# Allegro board T736_DEMO_CORE_AXP8191_LP4_4X_32X1_V2_0.brd
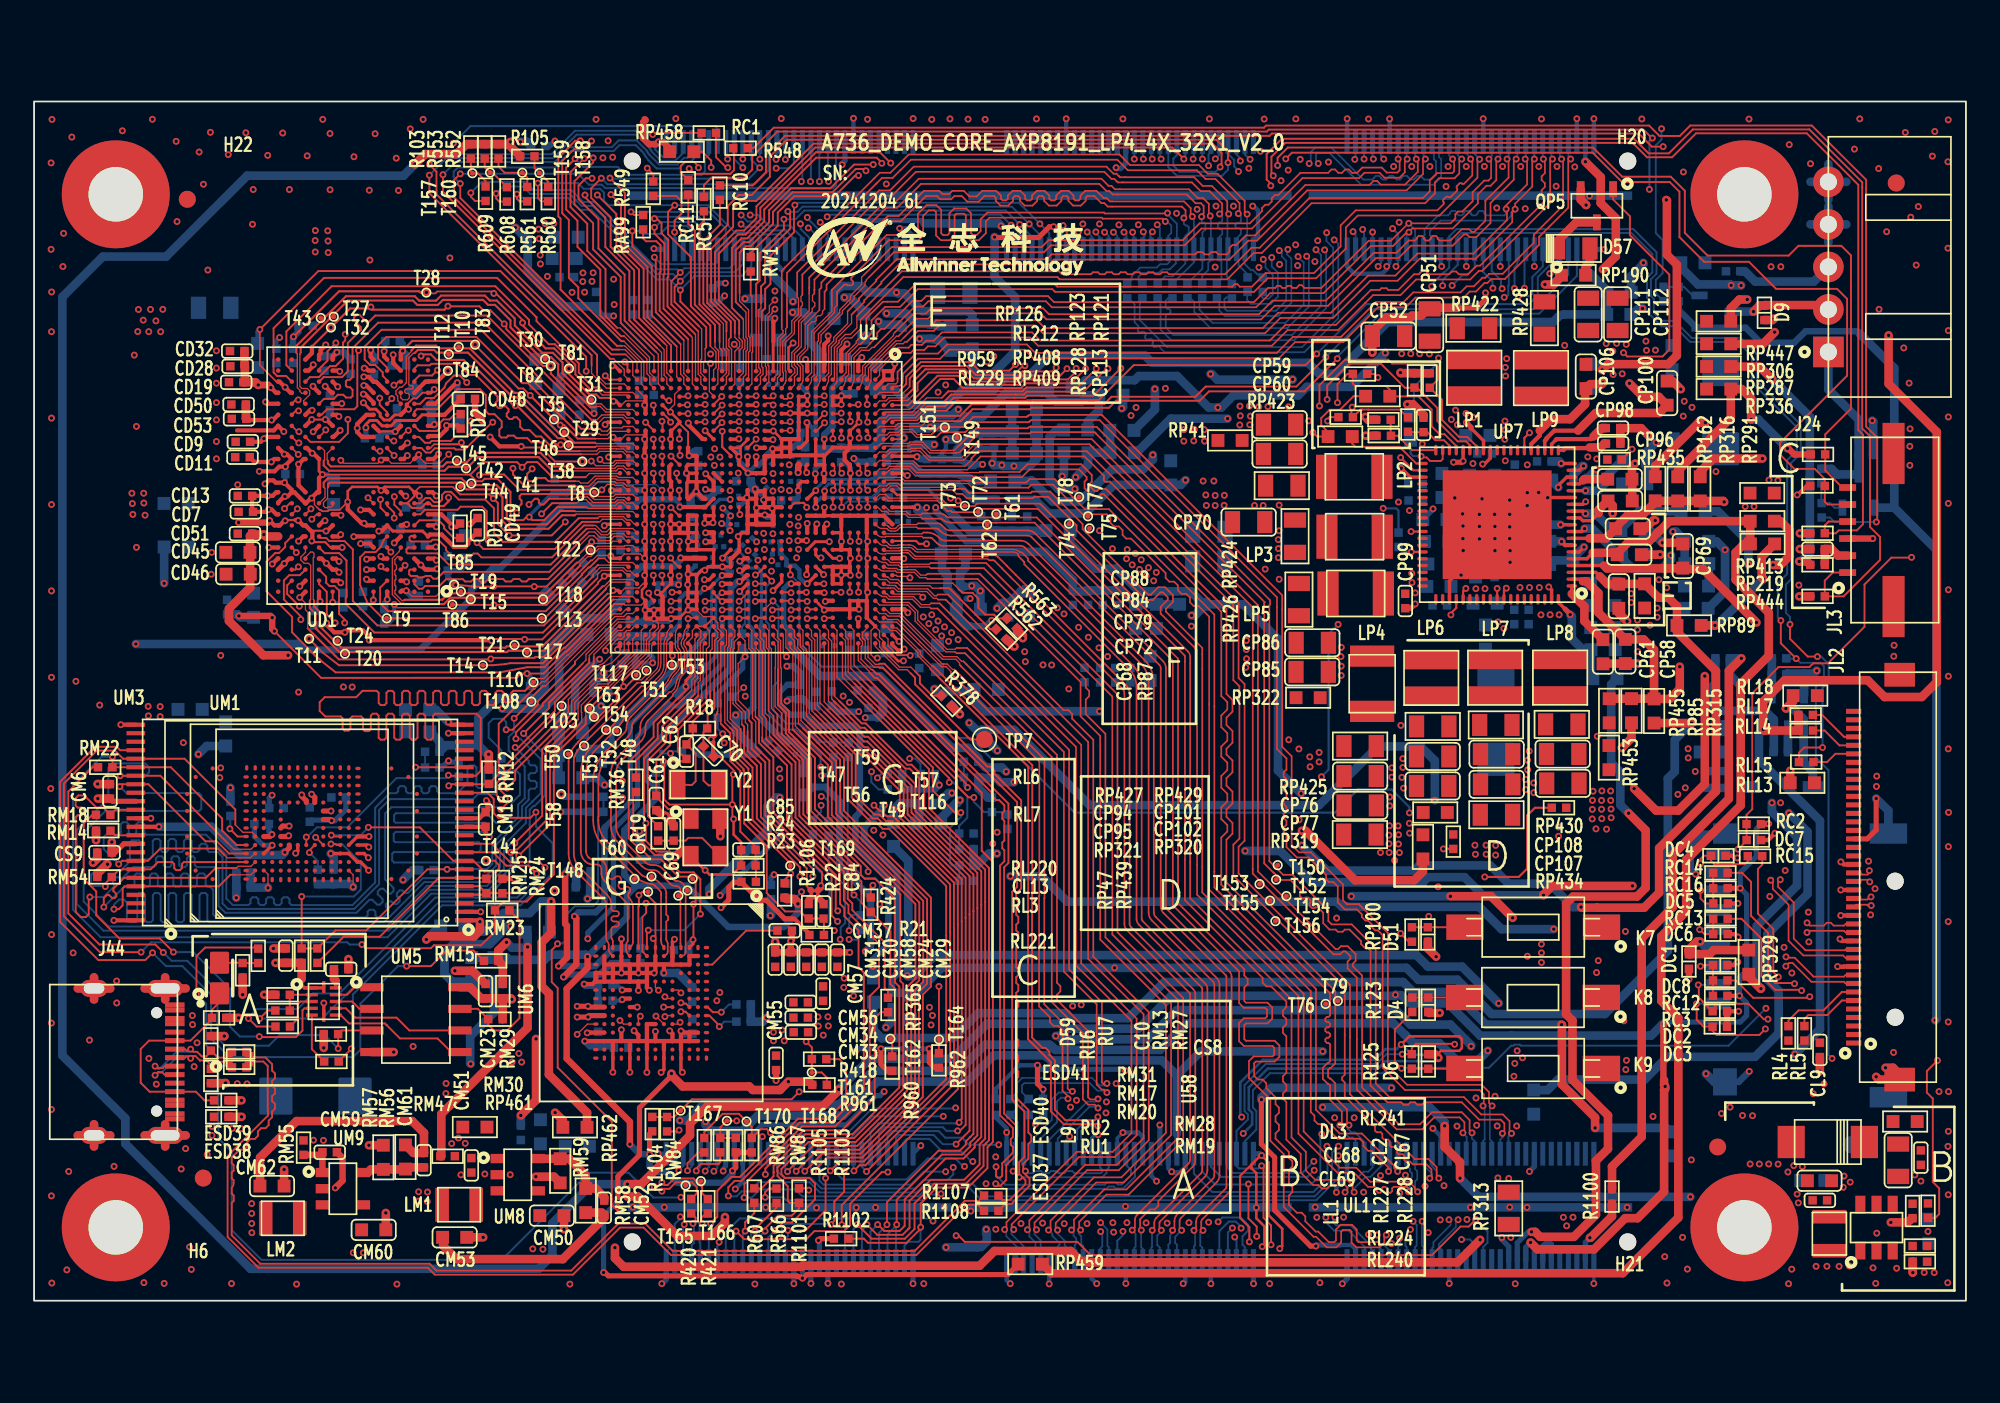
[diagram p0: board, top side]
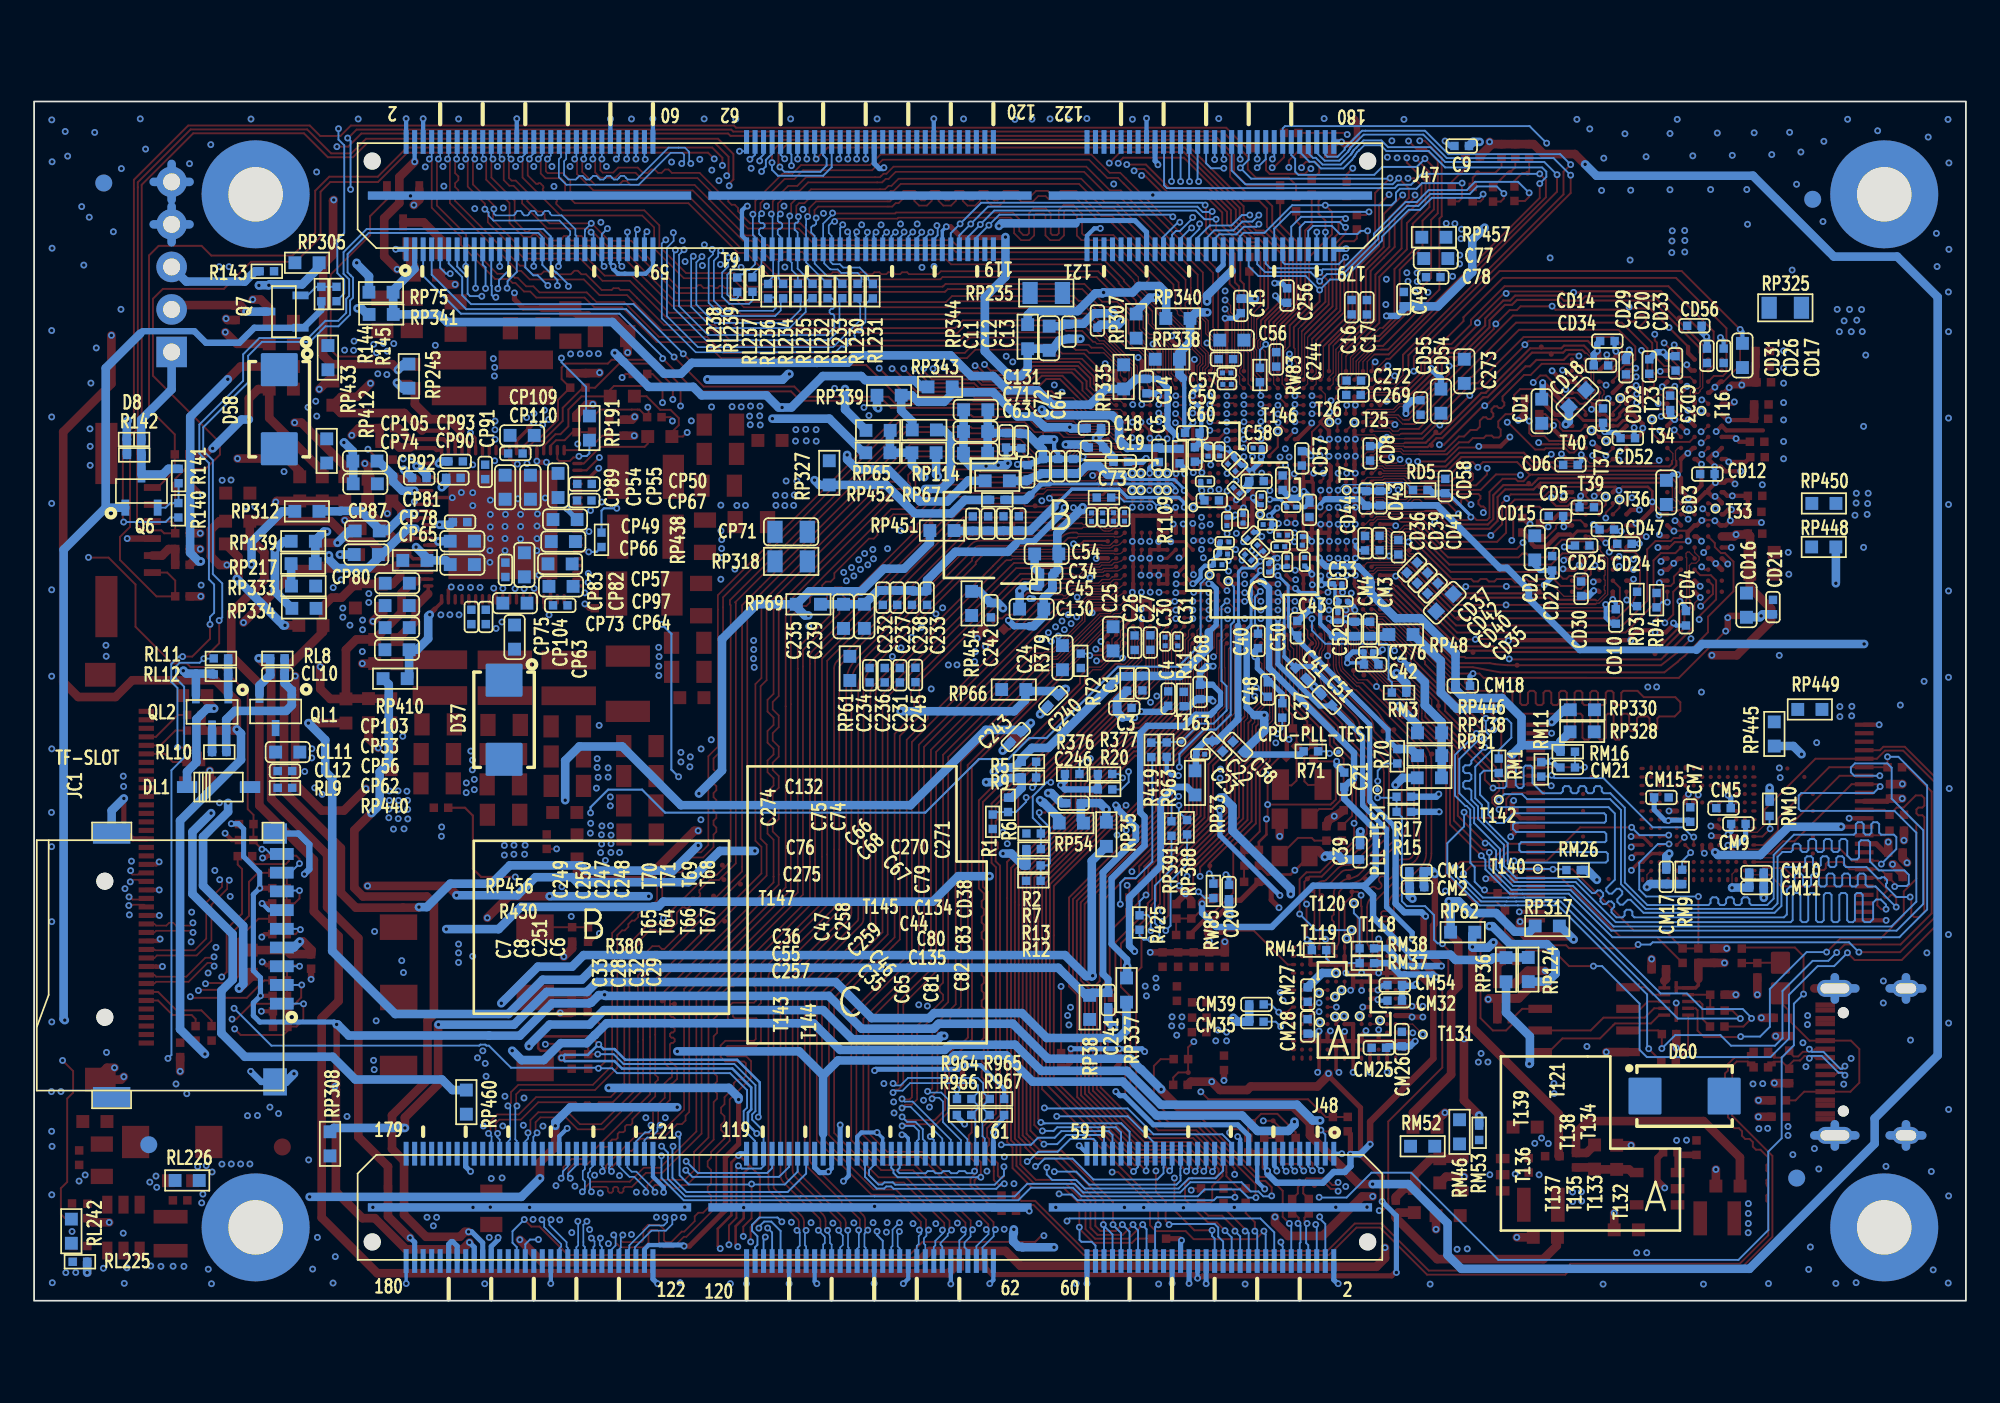
[diagram p1: board, bottom side, seen from below]

Outline 113.5 x 70.5 mm; copper layers: TOP, L2GND, L3, L4, L5GND, BOTTOM. Coordinates in mm from the lower left corner of the outline.
Outline path: rectangle 113.5,70.5 0,0

## Design rules (mm)
net group COMB0-LANE0: nets COMB0-LANE0-N COMB0-LANE0-P
net group COMB0-LANE1: nets COMB0-LANE1-N COMB0-LANE1-P
net group COMB0-LANE2: nets COMB0-LANE2-N COMB0-LANE2-P
net group COMB0-LANE3: nets COMB0-LANE3-N COMB0-LANE3-P
net group COMB1-REF: nets COMB1-REFN COMB1-REFP
net group COMB1-RX0: nets COMB1-RX0N COMB1-RX0P
net group COMB1-TX0: nets COMB1-TX0N COMB1-TX0P
net group D+: nets D+ USB0-DP-C
net group D-: nets D- USB0-DM-C
net group DP4: nets MCSIA-CKN-1 MCSIA-CKP-1
net group DP5: nets MCSIA-D0N-1 MCSIA-D0P-1
net group HTX0: nets HTX0N HTX0P
net group HTX1: nets HTX1N HTX1P
net group HTX2: nets HTX2N HTX2P
net group HTXC: nets HTXCN HTXCP
net group LVDS0-CKN: nets LVDS0-CKN LVDS0-CKN-1
net group LVDS0-CKP: nets LVDS0-CKP LVDS0-CKP-1
net group LVDS0-D0N: nets LVDS0-D0N LVDS0-D0N-1
net group LVDS0-D0P: nets LVDS0-D0P LVDS0-D0P-1
net group LVDS1-CK: nets LVDS1-CKN LVDS1-CKP
net group LVDS1-D0: nets LVDS1-D0N LVDS1-D0P
net group LVDS1-D1: nets LVDS1-D1N LVDS1-D1P
net group LVDS1-D2: nets LVDS1-D2N LVDS1-D2P
net group LVDS1-D3: nets LVDS1-D3N LVDS1-D3P
net group MCSIA-D1: nets MCSIA-D1N-1 MCSIA-D1P-1
net group MCSIA-D2: nets MCSIA-D2N-1 MCSIA-D2P-1
net group MCSIA-D3: nets MCSIA-D3N-1 MCSIA-D3P-1
net group MCSIB-CLK: nets MCSIB-CKN-1 MCSIB-CKP-1
net group MCSIB-D0: nets MCSIB-D0N-1 MCSIB-D0P-1
net group MCSIB-D1: nets MCSIB-D1N-1 MCSIB-D1P-1
net group MCSIB-D2: nets MCSIB-D2N-1 MCSIB-D2P-1
net group MCSIB-D3: nets MCSIB-D3N-1 MCSIB-D3P-1
net group MCSIC-D: nets MCSIC-D0N-1 MCSIC-D0P-1
net group NRE: nets N22856651 NRE
net group PJ0\PJ1: nets PJ0 PJ1
net group PJ2\PJ3: nets PJ2 PJ3
net group PJ4\PJ5: nets PJ4 PJ5
net group PJ6\PJ7: nets PJ6 PJ7
net group PJ8\PJ9: nets PJ8 PJ9
net group PJ10\PJ11: nets PJ10 PJ11
net group PJ12\PJ13: nets PJ12 PJ13
net group PJ14\PJ15: nets PJ14 PJ15
net group PJ16\PJ17: nets PJ16 PJ17
net group PJ18\PJ19: nets PJ18 PJ19
net group SDC0-CMD: nets N23161107 SDC0-CMD
net group SDC0-D0: nets N23161063 SDC0-D0
net group SDC0-D1: nets N23161069 SDC0-D1
net group SDC0-D2: nets N23161083 SDC0-D2
net group SDC0-D3: nets N23161095 SDC0-D3
net group SDQS0: nets SDQS0N SDQS0P
net group SDQS1: nets SDQS1N SDQS1P
net group SDQS2: nets SDQS2N SDQS2P
net group SDQS3: nets SDQS3N SDQS3P
net group UFS-RX0: nets UFS-RX0-N UFS-RX0-P
net group UFS-RX1: nets UFS-RX1-N UFS-RX1-P
net group UFS-TX0: nets UFS-TX0-N UFS-TX0-P
net group UFS-TX1: nets UFS-TX1-N UFS-TX1-P
net group USB1: nets USB1-DM USB1-DP
net group USB2: nets USB2-DM USB2-DP
net group WL-SDIO-CLK: nets N22863401 WL-SDIO-CLK
net group DDR_SDQ0_7: nets SDQ0 SDQ1 SDQ2 SDQ3 SDQ4 SDQ5 SDQ6 SDQ7 SDQM0
net group DDR_SDQ8_15: nets SDQ8 SDQ9 SDQ10 SDQ11 SDQ12 SDQ13 SDQ14 SDQ15 SDQM1
net group DDR_SDQ16_23: nets SDQ16 SDQ17 SDQ18 SDQ19 SDQ20 SDQ21 SDQ22 SDQ23 SDQM2
net group DDR_SDQ24_31: nets SDQ24 SDQ25 SDQ26 SDQ27 SDQ28 SDQ29 SDQ30 SDQ31 SDQM3
net group LVDS0-D1N: nets LVDS0-D1N-1
net group LVDS0-D1P: nets LVDS0-D1P-1
net group LVDS0-D2N: nets LVDS0-D2N-1
net group LVDS0-D2P: nets LVDS0-D2P-1
net group LVDS0-D3N: nets LVDS0-D3N-1
net group LVDS0-D3P: nets LVDS0-D3P-1
net group POWER: nets ALDO1 ALDO2 ALDO3 ALDO4 ALDO5 ALDO6 ALDO-6 ALDO-IN AVDD-H-COMB0 DCDC5FB DCDC6FB DCDC8FB DCDC9FB DCIN-12V DLDO1 DLDO2 DLDO3 DLDO4 DLDO5 DLDO6 DXLDO-OUT ELDO1 ELDO2 ELDO3 ELDO4 ELDO5 ELDO6 N17526892 N17526894 N17526934 N19391444 N19391490 N19391591 N21636269 N21636295 N21636444 N21636500 N22841119 N22841132 N22847489 N23277389 N23277413 N23290165 N23290202 N23290214 N23453672 N23494472 N23494527 N23494551 N23494639 PANEL0-12V RTC-VIO UFS-VCCQ UFS-VCCQ2 VCC18-HDMI VCC18-PF VCC33-18-USB-2 VCC33-USB VCC33-USB-2 VCC-1V8-AUDIO VCC-3V3-PHY VCC-5V VCC-CARD VCC-CPU-PLL VCC-CTP VCC-CTP0 VCC-DCXO VCC-DRAM VCC-DRAML VCC-EFUSE VCC-FLASH VCC-LDO-RTC VCC-LVDS0 VCC-MCSI VCC-NOR VCC-PD VCC-PE VCC-PG VCC-PH VCC-PI VCC-PJ VCC-PK VCC-PL VCC-PLL VCC-PM VCC-RTC VCC-UFS-IO VCC-VDDQ VCCIO-WIFI VDD08-HDMI VDD08-UFS VDD18-DRAM VDD18-LPDDR VDD-CPUBFB VDD-CPULFB VDD-CPUS VDD-GPUFB VDD-NPUFB VDD-SYSFB VDD-USB VDDI-EMMC VLED0+ VLED0- VREF
net group SDC0-CLK: nets N22863020 N23161119 SDC0-CLK
nets with their own width: min track width 0.076; nets FB-GND2

## Placement (name value [footprint] x y rotation side)
C1  2.2uF  [C0402]  48.38 36.3 90 bottom
C3  2.2uF  [C0402]  49.45 34.85 0 bottom
C4  470nF  [C0402]  46.87 35.4 270 bottom
C5  100nF  [C0402]  47.42 49.73 270 bottom
C6  1uF  [C0402]  55.64 45.69 90 bottom
C7  100nF  [C0402]  58.35 45.68 90 bottom
C8  100nF  [C0402]  57.45 45.69 90 bottom
C9  100nF  [C0402]  29.62 67.89 180 bottom
C10  100nF  [C0402]  14.79 20.29 90 top
C11  10uF  [C0603]  53.86 56.58 90 bottom
C12  100nF  [C0402]  52.71 56.97 90 bottom
C13  100nF  [C0402]  51.02 57.62 90 bottom
C14  100nF  [C0402]  48.14 53.77 270 bottom
C15  100nF  [C0402]  42.6 58.48 270 bottom
C16  1uF  [C0402]  36.09 58.41 90 bottom
C17  100nF  [C0402]  35.2 58.4 90 bottom
C18  100nF  [C0402]  51.24 51.3 180 bottom
C19  100nF  [C0402]  51.11 50.16 180 bottom
C20  100nF  [C0402]  43.3 24.02 270 bottom
C21  100nF  [C0402]  36.52 30.62 90 bottom
C22  2.2uF  [C0402]  43.97 32.6 225 bottom
C23  100nF  [C0201]  44.98 32.13 180 bottom
C24  22uF  [C0603]  53.08 37.8 270 bottom
C25  22uF  [C0603]  50.11 38.91 270 bottom
C26  10uF  [C0402]  48.84 38.68 270 bottom
C27  4.7uF  [C0402]  47.92 38.69 270 bottom
C28  2.2uF  [C0201]  50.72 46.06 90 bottom
C29  2.2uF  [C0201]  49.44 46.08 90 bottom
C30  1uF  [C0201]  47.04 38.76 270 bottom
C31  1uF  [C0201]  46.31 38.75 270 bottom
C32  100nF  [C0201]  50.09 46.07 90 bottom
C33  2.2uF  [C0201]  51.37 46.07 90 bottom
C34  10uF  [C0402]  53.98 42.79 180 bottom
C35  2.2uF  [C0201]  42.17 43.69 225 bottom
C36  1uF  [C0201]  43.55 44.6 0 bottom
C37  1nF  [C0402]  40.17 34.7 90 bottom
C38  100nF  [C0402]  42.76 32.56 45 bottom
C39  100nF  [C0402]  35.6 26.36 270 bottom
C40  1uF  [C0402]  41.59 38.79 270 bottom
C41  1uF  [C0402]  39.08 36.89 225 bottom
C42  4.7uF  [C0402]  34.94 37.4 180 bottom
C43  2.2uF  [C0201]  36.58 41.12 180 bottom
C44  100nF  [C0201]  41.04 45.63 0 bottom
C45  4.7uF  [C0402]  54.1 41.99 180 bottom
C46  1uF  [C0201]  41.45 44.24 225 bottom
C47  2.2uF  [C0201]  43.42 45.82 270 bottom
C48  1nF  [C0402]  41.02 35.93 90 bottom
C49  100nF  [C0402]  33.02 58.88 90 bottom
C50  1uF  [C0402]  39.28 39.53 90 bottom
C51  100nF  [C0402]  37.56 35.32 45 bottom
C52  100nF  [C0201]  36.9 40.2 270 bottom
C53  1uF  [C0201]  36.91 42.14 180 bottom
C54  22uF  [C0603]  54.01 43.9 180 bottom
C55  2.2uF  [C0201]  43.63 43.89 0 bottom
C56  10uF  [C0603]  43.13 56.47 0 bottom
C57  4.7uF  [C0402]  43.48 55.35 0 bottom
C58  2.2uF  [C0201]  41.62 50.12 180 bottom
C59  1uF  [C0201]  43.43 54.54 0 bottom
C60  100nF  [C0201]  43.41 53.87 0 bottom
C61  18pF-C0G  [C0402]  36.56 29.26 270 top
C62  22pF-C0G  [C0402]  38.33 32.28 270 top
C63  22uF  [C0603]  58.18 49.82 180 bottom
C64  4.7uF  [C0402]  55.49 50.54 90 bottom
C65  2.2uF  [C0201]  40.97 43.09 270 bottom
C66  1uF  [C0201]  43.18 49.37 135 bottom
C67  100nF  [C0201]  42.86 47.62 225 bottom
C68  1uF  [C0201]  42.74 48.94 135 bottom
C69  18pF-C0G  [C0402]  37.57 27.47 90 top
C70  22pF-C0G  [C0402]  39.63 32.3 315 top
C71  10uF  [C0603]  58.18 51.1 180 bottom
C72  4.7uF  [C0402]  56.4 50.58 90 bottom
C73  4.7uF  [C0402]  49.66 49.32 0 bottom
C74  1uF  [C0201]  43.85 49.92 90 bottom
C75  100nF  [C0201]  44.53 49.9 90 bottom
C76  100nF  [C0201]  44.7 48.17 0 bottom
C77  22uF  [C0603]  31.15 61.27 180 bottom
C78  4.7uF  [C0402]  31.3 60.17 180 bottom
C79  1uF  [C0201]  41.4 47.04 270 bottom
C80  1uF  [C0201]  40.11 45.01 0 bottom
C81  100nF  [C0201]  39.87 43.43 270 bottom
C82  100nF  [C0201]  38.85 43.45 270 bottom
C83  2.2uF  [C0201]  38.99 44.67 90 bottom
C84  NC  [C0402]  46.38 22.89 90 top
C85  NC  [C0402]  41.97 26.5 180 top
C130  22uF  [C0603]  54.89 40.66 180 bottom
C131  22uF  [C0603]  58.18 52.37 180 bottom
C132  100nF  [C0402]  45.45 51.02 180 bottom
C134  1uF  [C0201]  39.65 46.65 180 bottom
C135  1uF  [C0201]  40.27 44.33 0 bottom
C231  4.7uF  [C0402]  62.63 36.77 90 bottom
C232  100nF  [C0402]  63.64 41.33 270 bottom
C233  4.7uF  [C0402]  61.03 41.33 270 bottom
C234  100nF  [C0402]  64.41 36.77 90 bottom
C235  10uF  [C0603]  65.94 40.23 90 bottom
C236  4.7uF  [C0402]  63.52 36.77 90 bottom
C237  100nF  [C0402]  62.79 41.33 270 bottom
C238  4.7uF  [C0402]  61.92 41.33 270 bottom
C239  10uF  [C0603]  64.72 40.23 90 bottom
C240  100nF  [C0402]  53.62 35.29 315 bottom
C241  100nF  [C0402]  50.39 17.68 270 bottom
C242  100nF  [C0402]  57.29 40.6 270 bottom
C243  100nF  [C0402]  55.83 33.14 315 bottom
C244  100nF  [C0402]  40.52 55.34 270 bottom
C245  100nF  [C0402]  61.72 36.79 90 bottom
C246  100nF  [C0402]  52.43 29.25 0 bottom
C247  1uF  [C0402]  53.34 49.06 90 bottom
C248  1uF  [C0402]  52.45 49.06 90 bottom
C249  100nF  [C0402]  55.12 48.7 90 bottom
C250  100nF  [C0402]  54.23 49.06 90 bottom
C251  1uF  [C0402]  56.54 45.69 90 bottom
C256  100nF  [C0402]  39.88 59.09 90 bottom
C257  1uF  [C0201]  43.96 43.27 0 bottom
C258  1uF  [C0201]  42.47 45.97 90 bottom
C259  2.2uF  [C0201]  42.02 45 315 bottom
C268  100nF  [C0402]  45 35.79 270 bottom
C269  100nF  [C0402]  35.98 53.25 180 bottom
C270  4.7uF  [C0402]  41.68 48.18 0 bottom
C271  1uF  [C0402]  40.15 48.09 270 bottom
C272  2.2uF  [C0402]  35.97 54.09 180 bottom
C273  10uF  [C0603]  29.47 54.64 270 bottom
C274  4.7uF  [C0402]  45.3 49.75 90 bottom
C275  10uF  [C0402]  44.31 47.05 0 bottom
C276  2.2uF  [C0201]  35.11 38.14 180 bottom
CD1  22uF  [C0603]  24.93 52.29 90 bottom
CD2  10uF  [C0603]  25.34 44.26 270 bottom
CD3  10uF  [C0603]  17.6 47.52 90 bottom
CD4  1uF  [C0402]  16.45 40.12 270 bottom
CD5  1uF  [C0402]  22.28 46.64 0 bottom
CD6  100nF  [C0402]  23.24 49.14 180 bottom
CD7  100nF  [C0402]  12.44 46.38 180 top
CD8  1uF  [C0402]  35.01 49.81 90 bottom
CD9  100nF  [C0402]  12.27 50.5 180 top
CD10  1uF  [C0402]  20.58 40.22 270 bottom
CD11  100nF  [C0402]  12.25 49.59 180 top
CD12  100nF  [C0402]  15.19 48.6 180 bottom
CD13  100nF  [C0402]  12.39 47.32 180 top
CD14  100nF  [C0402]  21.07 56.42 0 bottom
CD15  100nF  [C0402]  24.09 46.13 180 bottom
CD16  22uF  [C0603]  12.9 40.89 270 bottom
CD17  10uF  [C0603]  13.13 55.57 90 bottom
CD18  10uF  [C0603]  22.83 53.04 315 bottom
CD19  1uF  [C0402]  11.88 53.99 180 top
CD20  1uF  [C0402]  18.61 54.92 90 bottom
CD21  100nF  [C0402]  11.34 40.78 270 bottom
CD22  100nF  [C0402]  21.32 52.03 270 bottom
CD23  100nF  [C0402]  17.37 52.78 270 bottom
CD24  100nF  [C0402]  20.06 44.5 180 bottom
CD25  100nF  [C0402]  22.54 44.4 0 bottom
CD26  100nF  [C0402]  14.24 55.55 90 bottom
CD27  100nF  [C0402]  24.31 43.35 270 bottom
CD28  100nF  [C0402]  11.96 54.93 180 top
CD29  100nF  [C0402]  19.98 54.88 90 bottom
CD30  100nF  [C0402]  22.61 41.85 270 bottom
CD31  100nF  [C0402]  15.22 55.55 90 bottom
CD32  100nF  [C0402]  11.94 55.83 180 top
CD33  100nF  [C0402]  17.06 55.1 90 bottom
CD34  100nF  [C0402]  21.44 54.98 0 bottom
CD35  10uF  [C0603]  30.62 41.03 315 bottom
CD36  2.2uF  [C0402]  35.31 44.54 270 bottom
CD37  2.2uF  [C0402]  32.54 43.1 315 bottom
CD38  1uF  [C0402]  38.57 46.49 90 bottom
CD39  1uF  [C0402]  34.45 44.54 270 bottom
CD40  100nF  [C0402]  31.33 41.88 315 bottom
CD41  100nF  [C0402]  33.35 44.29 270 bottom
CD42  100nF  [C0402]  31.93 42.49 315 bottom
CD43  1uF  [C0402]  34.43 47.18 90 bottom
CD44  100nF  [C0402]  35.24 47.17 90 bottom
CD45  22uF  [C0603]  11.98 43.99 180 top
CD46  10uF  [C0603]  11.99 42.71 180 top
CD47  100nF  [C0402]  21.1 45.34 0 bottom
CD48  100nF  [C0402]  25.48 53.02 0 top
CD49  100nF  [C0402]  26.06 45.59 90 top
CD50  100nF  [C0402]  12.02 52.69 180 top
CD51  100nF  [C0402]  12.39 45.09 180 top
CD52  100nF  [C0402]  19.87 50.71 0 bottom
CD53  100nF  [C0402]  12.04 51.85 180 top
CD54  10uF  [C0603]  30.84 52.88 90 bottom
CD55  4.7uF  [C0402]  32.04 52.51 90 bottom
CD56  1uF  [C0402]  15.95 57.32 180 bottom
CD57  100nF  [C0402]  39.02 49.52 90 bottom
CD58  1uF  [C0402]  30.59 47.89 270 bottom
CL2  1uF-50V  [C0805]  109.52 8.26 90 top
CL9  100nF  [C0402]  104.92 14.75 90 top
CL10  1uF-50V  [C0402]  99.21 36.83 0 bottom
CL11  10uF-50V  [C0603]  98.6 32.25 0 bottom
CL12  100nF-50V  [C0402]  98.76 31.14 0 bottom
CL13  100nF  [C0402]  104.78 44.19 180 top
CL67  100nF-50V  [C0402]  110.85 8.41 90 top
CL68  10uF  [C0603]  104.9 7.05 0 top
CL69  1nF  [C0402]  104.92 5.9 0 top
CM1  100nF  [C0402]  32.28 25.24 0 bottom
CM2  4.7uF  [C0402]  32.25 24.31 0 bottom
CM3  100nF  [C0402]  35 39.49 90 bottom
CM4  4.7uF  [C0402]  35.91 39.49 90 bottom
CM5  100nF  [C0402]  14.24 28.96 180 bottom
CM6  4.7uF  [C0402]  4.46 29.94 90 top
CM7  4.7uF  [C0402]  16.2 28.58 270 bottom
CM9  100nF  [C0402]  13.37 28.03 180 bottom
CM10  1uF  [C0402]  12.31 25.17 180 bottom
CM11  100nF  [C0402]  12.3 24.29 180 bottom
CM15  1uF  [C0402]  17.89 29.59 0 bottom
CM16  100nF  [C0402]  26.53 28.29 90 top
CM17  1uF  [C0402]  17.6 24.92 270 bottom
CM18  100nF  [C0402]  29.56 36.15 180 bottom
CM21  100nF  [C0402]  23.4 31.35 0 bottom
CM23  100nF  [C0402]  26.52 18.2 90 top
CM24  2.2uF  [C0402]  46.28 20.05 90 top
CM25  1uF  [C0402]  34.49 14.87 180 bottom
CM26  4.7uF  [C0402]  33.14 15.38 270 bottom
CM27  4.7uF  [C0402]  38.67 18 90 bottom
CM28  100nF  [C0402]  38.68 16.13 270 bottom
CM29  4.7uF  [C0402]  47.2 20.05 90 top
CM30  100nF  [C0402]  44.46 20.05 90 top
CM31  100nF  [C0402]  43.54 20.05 90 top
CM32  4.7uF  [C0402]  33.56 17.64 180 bottom
CM33  100nF  [C0402]  45.05 15.79 0 top
CM34  100nF  [C0402]  45.04 16.64 0 top
CM35  2.2uF  [C0402]  41.69 16.4 0 bottom
CM37  2.2uF  [C0402]  44.1 21.76 0 top
CM39  2.2uF  [C0402]  41.68 17.42 0 bottom
CM50  10uF  [C0603]  30.42 5 0 top
CM51  NC/100nF  [C0402]  25.69 7.96 90 top
CM52  100pF  [C0402]  33.5 5.46 270 top
CM53  10uF  [C0603]  24.71 3.73 0 top
CM54  4.7uF  [C0402]  33.56 18.56 180 bottom
CM55  2.2uF  [C0402]  43.59 13.98 270 top
CM56  1uF  [C0402]  45.04 17.54 0 top
CM57  4.7uF  [C0402]  46.36 18.06 270 top
CM58  1uF  [C0402]  45.37 20.05 90 top
CM59  NC/100nF  [C0402]  17.37 8.73 180 top
CM60  10uF  [C0603]  19.96 4.17 0 top
CM61  100pF  [C0402]  22.91 8.26 90 top
CM62  10uF  [C0603]  13.98 6.74 0 top
CP49  10uF/6.3V  [C0603]  82.3 45.93 180 bottom
CP50  0.1uF/6.3V  [C0402]  81.16 48.01 180 bottom
CP51  22uF/6.3V  [C0805]  81.99 57.36 270 top
CP52  NC/22uF-6.3V  [C0805]  79.57 56.71 0 top
CP53  10uF/6.3V  [C0603]  92.17 40.87 0 bottom
CP54  10uF/6.3V  [C0603]  84.34 47.82 270 bottom
CP55  10uF/6.3V  [C0603]  82.71 47.93 270 bottom
CP56  10uF/6.3V  [C0603]  92.17 39.57 0 bottom
CP57  10uF/6.3V  [C0603]  82.59 43.31 180 bottom
CP58  4.7uF  [C0603]  93.49 38.17 270 top
CP59  22uF/6.3V  [C0805]  73.18 51.5 180 top
CP60  NC/22uF-6.3V  [C0805]  73.18 49.78 180 top
CP61  4.7uF  [C0603]  92.17 38.15 270 top
CP62  4.7uF  [C0603]  92.18 38.27 0 bottom
CP63  10uF/6.3V  [C0603]  85.27 39.02 90 bottom
CP64  0.1uF/6.3V  [C0402]  82.59 40.88 180 bottom
CP65  10uF/6.3V  [C0603]  88.34 43.28 180 bottom
CP66  10uF/6.3V  [C0603]  82.4 44.63 180 bottom
CP67  0.1uF/6.3V  [C0402]  81.17 47.04 180 bottom
CP68  4.7uF  [C0603]  93.11 41.42 270 top
CP69  4.7uF  [C0603]  96.86 43.78 90 top
CP70  NC/22uF/6.3V  [C0805]  71.36 45.77 0 top
CP71  NC/22uF-6.3V  [C0805]  69.02 45.2 0 bottom
CP72  4.7uF  [C0603]  93.72 43.86 0 top
CP73  10uF/6.3V  [C0603]  85.25 41.01 0 bottom
CP74  10uF/6.3V  [C0603]  94.04 48.02 0 bottom
CP75  0.1uF/6.3V  [C0402]  87.81 40.2 90 bottom
CP76  NC/22uF/6.3V  [C0805]  77.91 30.84 180 top
CP77  NC/22uF-6.3V  [C0805]  77.91 29.12 180 top
CP78  4.7uF  [C0603]  88.34 44.65 180 bottom
CP79  4.7uF  [C0603]  93.63 45.39 0 top
CP80  4.7uF  [C0603]  93.98 43.87 0 bottom
CP81  4.7uF  [C0402]  88.47 45.78 180 bottom
CP82  10uF/6.3V  [C0603]  84.69 43.26 270 bottom
CP83  0.1uF/6.3V  [C0402]  85.81 42.97 270 bottom
CP84  4.7uF  [C0603]  93.19 47.01 0 top
CP85  22uF/6.3V  [C0805]  75.09 36.97 180 top
CP86  NC/22uF-6.3V  [C0805]  75.1 38.68 180 top
CP87  4.7uF  [C0603]  93.93 45.25 0 bottom
CP88  10uF/6.3V  [C0603]  93.17 48.3 0 top
CP89  10uF/6.3V  [C0603]  85.82 47.82 90 bottom
CP90  4.7uF  [C0402]  88.86 48.37 180 bottom
CP91  0.1uF/6.3V  [C0402]  87 48.72 90 bottom
CP92  4.7uF  [C0402]  90.87 48.37 0 bottom
CP93  4.7uF  [C0402]  88.73 49.34 180 bottom
CP94  22uF/6.3V  [C0805]  82.17 32 0 top
CP95  NC/22uF-6.3V  [C0805]  82.17 30.26 0 top
CP96  4.7uF  [C0402]  92.77 50.39 0 top
CP97  10uF/6.3V  [C0603]  82.54 41.99 180 bottom
CP98  4.7uF  [C0402]  92.76 51.3 0 top
CP99  0.1uF/6.3V  [C0402]  80.56 41.14 90 top
CP100  4.7uF  [C0603]  95.94 53.36 90 top
CP101  22uF/6.3V  [C0805]  85.93 32.13 180 top
CP102  NC/22uF-6.3V  [C0805]  85.93 30.36 180 top
CP103  10uF/6.3V  [C0603]  92.16 42.18 180 bottom
CP104  0.1uF/6.3V  [C0402]  86.96 40.2 90 bottom
CP105  1uF/6.3V  [C0603]  94.06 49.36 180 bottom
CP106  4.7uF/6.3V  [C0603]  91.17 54.33 270 top
CP107  22uF/6.3V  [C0805]  89.82 30.42 0 top
CP108  NC/22uF-6.3V  [C0805]  89.81 32.14 0 top
CP109  10uF/6.3V  [C0603]  84.82 50.87 0 bottom
CP110  0.1uF/6.3V  [C0402]  85.22 49.81 0 bottom
CP111  22uF/6.3V  [C0805]  91.31 57.99 90 top
CP112  NC/22uF-6.3V  [C0805]  93.03 57.99 90 top
CP113  100nF  [C0402]  81.63 51.48 270 top
CPU-PLL-TEST  TEST  [TP30]  36.87 32.26 270 bottom
CS8  100nF  [C0402]  18.04 19.49 0 top
CS9  100nF  [C0402]  4.14 26.35 180 top
D4  ESD5451X-2-TR  [ESD0402]  81.91 17.4 90 top
D6  ESD5451X-2-TR  [ESD0402]  81.91 14.06 270 top
D8  ESD5451X-2-TR  [ESD0402]  107.63 50.63 180 bottom
D9  ESD5451X-2-TR  [ESD0402]  101.66 58.08 90 top
D37  AS3BD  [SMB]  85.89 34.15 270 bottom
D51  ESD5451X-2-TR  [ESD0402]  81.89 21.53 90 top
D57  RLED  [LED0805]  90.46 61.87 180 top
D58  NC/AS3BD  [SMB]  99.09 52.41 270 bottom
D59  IN5819  [SOD323]  10.9 18.97 90 top
D60  AS3BD  [SMB]  16.53 12.03 180 bottom
DC1  PT2C051N  [ESD0402]  97.22 19.94 90 top
DC2  PT2C051U  [ESD0402]  99.04 17.02 180 top
DC3  PT2C051U  [ESD0402]  99.04 16.1 180 top
DC4  PT2C051U  [ESD0402]  98.96 26.16 180 top
DC5  PT2C051U  [ESD0402]  99.08 23.36 180 top
DC6  PT2C051U  [ESD0402]  99.08 21.55 180 top
DC7  NC/PT2C051N  [ESD0402]  101.04 27.08 180 top
DC8  PT2C051N  [ESD0402]  99.07 19.73 180 top
DL1  XBS104S14  [SOD155_270H118]  102.66 30.2 0 bottom
DL3  SS16F  [SOD250_380H100]  105.38 9.33 0 top
ESD37  ESD9N5BU  [ESD0402]  10.39 13.21 90 top
ESD38  ESD5451X-2-TR  [ESD0402]  11 10.81 180 top
ESD39  ESD5451X-2-TR  [ESD0402]  11 11.78 180 top
ESD40  ESD9N5BU  [ESD0402]  10.39 15.13 270 top
ESD41  ESD5451X-2-TR  [ESD0402]  10.87 16.63 180 top
H6  NC-HOLE  [MTH635D320]  4.8 4.31 270 top
H20  NC-HOLE  [MTH635D320]  100.48 65.04 270 top
H21  NC-HOLE  [MTH635D320]  100.48 4.31 270 top
H22  NC-HOLE  [MTH635D320]  4.8 65.04 270 top
J24  ZX-XH2.54-5PWZ  [SKT5P250B700_1500H570_R_THR]  109.02 60.78 90 top
J44  Type-C  [USB20P50B894_735H426]  4.67 14.04 270 top
J47  LB242-180P-B3R-01  [SEDM2_90P50B597_6000H426]  64.39 64.97 0 bottom
J48  LB242-180P-B3R-01  [SEDM2_90P50B597_6000H426]  64.39 5.49 180 bottom
JC1  TF-SLOT  [SDC13B1450_1472H245]  106.09 19.71 90 bottom
JL2  LVDS0_CN_40PIN  [FPC42P50B450_2410H150]  109.51 24.9 90 top
JL3  CTP_CN  [FPC8P100B515_1090H340_B]  109.32 45.31 90 top
K7  POWER  [KEY2B350_600H350]  88.08 21.96 180 top
K8  FEL  [KEY2B350_600H350]  88.06 17.83 180 top
K9  AP-RESET  [KEY2B350_600H350]  88.07 13.65 180 top
L9  NC/ICMF112P900MFR  [LC4P55B100_125H50]  12.02 14.2 90 top
LL1  10uH-DCR<0.1R-2A  [LP200_250H100]  105.48 3.94 270 top
LM1  2.2uH-2A  [LP200_250H100]  24.98 5.64 180 top
LM2  2.2uH-2A  [LP200_250H100]  14.61 4.84 180 top
LP1  1uH/4A  [LP300_300H100]  84.61 54.26 90 top
LP2  0.47uH/5A  [LP250_320H130]  77.56 48.44 180 top
LP3  0.47uH/5A  [LP250_320H130]  77.58 44.92 180 top
LP4  0.47uH/5A  [LP250_320H130]  78.61 36.27 270 top
LP5  1uH/5A  [LP250_320H130]  77.65 41.58 180 top
LP6  1uH/4A  [LP300_300H100]  82.09 36.61 270 top
LP7  1uH/4A  [LP300_300H100]  85.84 36.62 270 top
LP8  1uH/4A  [LP300_300H100]  89.66 36.63 270 top
LP9  1uH/4A  [LP300_300H100]  88.53 54.24 90 top
NOREF  -  [unnamed]  109.4 65.71 0 top
NOREF#2  -  [#2]  -79.67 -50.87 0 top
NOREF#3  -  [#2]  0 70.5 0 top
NOREF#4  -  [unnamed]  9.94 7.21 0 top
NOREF#5  -  [unnamed]  9.01 64.75 0 top
NOREF#6  -  [#2]  0 0 90 top
NOREF#7  -  [#2]  49.99 61.65 0 top
NOREF#8  -  [unnamed]  98.91 9.04 0 top
NOREF#9  -  [unnamed]  106.76 9.17 180 bottom
NOREF#10  -  [unnamed]  9.94 7.21 180 bottom
NOREF#11  -  [unnamed]  109.4 65.71 180 bottom
NOREF#12  -  [unnamed]  9.01 64.75 180 bottom
PLL-TEST  TEST  [TP30]  34.58 30.04 270 bottom
Q6  2N7002  [SOT3P95B130_290H103]  107.19 47.6 90 bottom
Q7  2N7002  [SOT3P95B130_290H103]  98.82 58.15 0 bottom
QL1  AO3401  [SOT3P95B130_290H103]  99.31 34.64 270 bottom
QL2  MMBT3904  [SOT3P95B130_290H103]  103.04 34.62 270 bottom
QP5  2N7002  [SOT3P95B130_290H103]  91.82 64.37 270 top
R1  NC/47K-1%  [R0402]  57.18 28.16 270 bottom
R2  10K-1%  [R0402]  54.77 27.47 180 bottom
R5  10K-1%  [R0402]  55.05 31.69 180 bottom
R6  10K-1%  [R0402]  56.28 29.15 270 bottom
R7  NC-1%  [R0402]  54.77 26.55 0 bottom
R9  3.9K-1%  [R0402]  55.05 30.76 0 bottom
R11  0R  [R0402]  45.96 35.37 270 bottom
R12  10K-1%  [R0402]  54.79 24.69 180 bottom
R13  27K-1%  [R0402]  54.79 25.59 180 bottom
R15  1K  [R0402]  33.03 28.74 0 bottom
R17  NC  [R0402]  33.03 29.63 0 bottom
R18  10M  [R0402]  39.12 33.64 0 top
R19  0R  [R0402]  36.67 27.47 270 top
R20  200R-1%  [R0402]  50.57 30.06 180 bottom
R21  NC/10K  [R0402]  45.98 21.5 0 top
R22  0R  [R0402]  45.51 22.89 270 top
R23  10K  [R0402]  41.99 24.62 0 top
R24  NC/0R  [R0402]  41.97 25.58 180 top
R70  NC/75R  [R0402]  33.41 32.01 90 bottom
R71  NC/75R  [R0402]  38.49 32.3 0 bottom
R72  0R  [R0402]  49.29 36.28 270 bottom
R103  10K  [R0402]  25.66 67.57 90 top
R105  10K  [R0402]  28.98 67.28 180 top
R123  1K  [R0402]  80.97 17.4 90 top
R125  1K  [R0402]  80.94 14.07 270 top
R140  1K  [R0402]  105.02 46.47 270 bottom
R141  NC/1K  [R0402]  105.01 48.48 90 bottom
R142  10K  [R0402]  107.62 49.72 0 bottom
R143  NC  [R0402]  99.83 60.52 0 bottom
R144  10K  [R0402]  96.62 59.18 90 bottom
R145  1K  [R0402]  95.73 59.18 270 bottom
R376  3.01K-1%  [R0402]  52.51 30.96 180 bottom
R377  3.01K-1%  [R0402]  50.58 30.96 180 bottom
R378  200R-1%  [R0402]  53.6 35.27 135 top
R379  200R-1%  [R0402]  52.01 37.62 90 bottom
R380  1.62K-1%  [R0402]  50.64 47.22 180 bottom
R418  0R  [R0402]  46.12 14.2 0 top
R419  0R  [R0402]  47.86 32.38 270 bottom
R420  0R  [R0402]  38.61 5.56 270 top
R421  0R  [R0402]  39.58 5.55 270 top
R424  0R  [R0402]  49.15 23.28 90 top
R425  0R  [R0402]  48.55 22.23 270 bottom
R430  0R  [R0402]  56.91 47.08 180 bottom
R548  NC/0R  [R0402]  41.51 67.76 180 top
R549  NC/0R  [R0402]  36.38 65.37 270 top
R552  10K  [R0402]  27.29 67.57 90 top
R553  10K  [R0402]  26.48 67.57 90 top
R560  NC/0R  [R0402]  30.21 65.05 270 top
R561  NC/0R  [R0402]  28.98 65.05 270 top
R562  0R  [R0402]  56.82 39.18 135 top
R563  0R  [R0402]  57.45 39.81 135 top
R566  0R  [R0402]  43.62 6.17 270 top
R607  0R  [R0402]  42.32 6.18 270 top
R608  NC/0R  [R0402]  27.78 65.04 270 top
R609  NC/0R  [R0402]  26.53 65.08 270 top
R959  0R  [R0402]  77.06 51.94 0 top
R960  10K  [R0402]  50.41 13.94 270 top
R961  10K  [R0402]  46.15 12.69 180 top
R962  10K  [R0402]  53.16 14.13 270 top
R963  10K  [R0402]  46.96 32.4 270 bottom
R964  51K-1%  [R0402]  58.85 11.86 0 bottom
R965  51K-1%  [R0402]  56.93 11.86 180 bottom
R966  51K-1%  [R0402]  58.86 10.92 180 bottom
R967  51K-1%  [R0402]  56.93 10.92 0 bottom
R1100  NC/0R  [R0402]  92.71 6.12 90 top
R1101  NC/0R  [R0402]  44.94 6.18 90 top
R1102  10K-1%  [R0402]  47.42 3.65 180 top
R1103  10K  [R0402]  42.16 9.15 270 top
R1104  10K  [R0402]  36.32 10.38 270 top
R1105  10K  [R0402]  41.22 9.15 270 top
R1106  10K  [R0402]  44.09 24.12 270 top
R1107  NC  [R0402]  56.24 6.18 180 top
R1108  NC  [R0402]  56.23 5.29 180 top
R1109  0R  [R0402]  46.2 49.65 270 bottom
RA99  33R  [R0402]  35.78 63.4 270 top
RC1  33R  [R0402]  39.64 68.65 180 top
RC2  NC/47K  [R0402]  101.03 28.02 0 top
RC3  NC/10K  [R0402]  99.06 17.93 0 top
RC5  1K  [R0402]  39.35 64.47 90 top
RC10  22R  [R0402]  40.29 65.14 90 top
RC11  22R  [R0402]  38.44 65.45 90 top
RC12  22R  [R0402]  99.06 18.83 180 top
RC13  22R  [R0402]  99.08 22.45 180 top
RC14  22R  [R0402]  99.07 25.15 180 top
RC15  22R  [R0402]  101.11 26.14 180 top
RC16  NC/10K  [R0402]  99.08 24.25 0 top
RD1  0R  [R0402]  25.03 45.27 90 top
RD2  0R  [R0402]  25.06 51.7 270 top
RD3  240R-1%  [R0402]  19.32 41.25 90 bottom
RD4  240R-1%  [R0402]  18.18 41.19 90 bottom
RD5  120R-1%  [R0402]  32.06 47.66 180 bottom
RL3  0R  [R0402]  104.78 43.26 180 top
RL4  NC  [R0402]  103.07 15.72 90 top
RL5  NC  [R0402]  104.01 15.72 90 top
RL6  4K7  [R0402]  104.81 49.75 180 top
RL7  4K7  [R0402]  104.78 47.9 180 top
RL8  100K  [R0402]  99.21 37.77 180 bottom
RL9  100K  [R0402]  98.76 30.15 180 bottom
RL10  33R  [R0402]  102.62 32.26 180 bottom
RL11  10K  [R0402]  102.52 37.76 180 bottom
RL12  100K  [R0402]  102.52 36.82 180 bottom
RL13  NC/0R  [R0603]  103.89 30.45 0 top
RL14  NC/10K  [R0402]  104.09 33.52 0 top
RL15  0R  [R0402]  104.12 31.67 180 top
RL17  NC-10K  [R0402]  104.08 34.44 180 top
RL18  NC/0R  [R0603]  104.06 35.57 0 top
RL212  NC/0R  [R0603]  78.94 53.17 0 top
RL220  4K7  [R0402]  104.78 45.12 180 top
RL221  4K7  [R0402]  104.78 41.41 180 top
RL224  0R  [R0402]  110.79 3.22 180 top
RL225  4R7-1%  [R0402]  110.81 2.29 180 bottom
RL226  0R  [R0603]  104.5 7.07 0 bottom
RL227  1M  [R0402]  110.36 5.28 90 top
RL228  0R  [R0402]  111.27 5.29 90 top
RL229  0R  [R0603]  76.74 50.8 0 top
RL230  0R  [R0402]  65.12 59.36 90 bottom
RL231  0R  [R0402]  64.22 59.35 90 bottom
RL232  0R  [R0402]  66.88 59.36 90 bottom
RL233  0R  [R0402]  66.01 59.36 90 bottom
RL234  0R  [R0402]  68.63 59.36 90 bottom
RL235  0R  [R0402]  67.76 59.36 90 bottom
RL236  0R  [R0402]  69.49 59.36 90 bottom
RL237  0R  [R0402]  70.37 59.35 90 bottom
RL238  0R  [R0402]  72.19 59.73 90 bottom
RL239  0R  [R0402]  71.29 59.74 90 bottom
RL240  4R7-1%  [R0402]  110.79 2.29 0 top
RL241  0R  [R0603]  109.93 10.54 180 top
RL242  0R  [R0603]  111.31 4.09 90 bottom
RM1  33R  [R0402]  27.45 31.45 270 bottom
RM3  200R-1%  [R0402]  33.31 35.75 0 bottom
RM9  0R  [R0402]  16.68 24.92 90 bottom
RM10  0R  [R0402]  11.53 28.92 270 bottom
RM11  NC/10K  [R0402]  24.95 31.24 90 bottom
RM12  NC/10K  [R0402]  26.72 30.81 90 top
RM13  NC/10K  [R0402]  15.72 20.29 270 top
RM14  NC/0R  [R0402]  4.07 27.63 180 top
RM15  NC/0R  [R0402]  26.85 19.98 0 top
RM16  10K  [R0402]  23.4 32.27 0 bottom
RM17  NC  [R0402]  14.6 17.06 180 top
RM18  NC  [R0402]  4.06 28.57 0 top
RM19  NC  [R0402]  17.47 14.06 0 top
RM20  NC  [R0402]  14.61 16.12 180 top
RM22  NC  [R0402]  4.18 31.36 0 top
RM23  NC  [R0402]  27.51 22.95 180 top
RM24  NC/10K  [R0402]  27.52 24.38 90 top
RM25  NC/0R  [R0402]  26.58 24.38 270 top
RM26  NC/10K  [R0402]  23.05 25.32 180 bottom
RM27  NC/0R  [R0402]  16.65 20.29 90 top
RM28  10K  [R0402]  17.44 15.68 180 top
RM29  NC/0R  [R0402]  27.54 18.2 270 top
RM30  10K  [R0402]  27.11 16.55 0 top
RM31  10K  [R0402]  14.6 17.99 180 top
RM36  33R  [R0402]  35.37 30.33 270 top
RM37  NC/10K  [R0402]  35.2 19.85 180 bottom
RM38  49.9K  [R0402]  35.2 20.71 180 bottom
RM41  NC/100K  [R0402]  38 20.61 180 bottom
RM46  0.01R-1%  [R0603]  29.75 9.93 90 bottom
RM47  0R  [R0402]  24.3 8.5 0 top
RM52  NC/0.01R-1%  [R0603]  31.92 9.08 0 bottom
RM53  0.01R-1%  [R0402]  28.6 9.87 90 bottom
RM54  NC/10K  [R0402]  4.14 24.91 180 top
RM55  0R  [R0402]  15.83 9 270 top
RM56  15K-1%  [R0603]  21.82 8.45 90 top
RM57  3K3-1%  [R0603]  20.52 8.43 270 top
RM58  20K-1%  [R0603]  32.41 5.89 270 top
RM59  10K-1%  [R0603]  30.91 7.64 90 top
RP33  0.01R-1%  [R0603]  45.29 30.44 90 bottom
RP35  NC  [R0603]  50.5 27.42 90 bottom
RP36  0.01R-1%  [R0603]  27.02 19.46 90 bottom
RP38  0.01R-1%  [R0603]  51.48 17.24 90 bottom
RP41  0.01R-1%  [R0603]  70.26 50.57 180 top
RP47  0.01R-1%  [R0603]  81.6 26.68 90 top
RP48  0.01R-1%  [R0603]  33.19 39.17 0 bottom
RP54  0.01R-1%  [R0603]  52.56 28.08 180 bottom
RP61  0.01R-1%  [R0603]  65.57 37.17 270 bottom
RP62  0.01R-1%  [R0603]  29.57 21.67 180 bottom
RP65  0.01R-1%  [R0603]  63.91 51.17 0 bottom
RP66  0.01R-1%  [R0603]  55.94 35.93 180 bottom
RP67  0.01R-1%  [R0603]  61.21 49.85 180 bottom
RP69  0.01R-1%  [R0603]  68.01 40.94 180 bottom
RP75  NC  [R0603]  93.12 59.28 180 bottom
RP85  0.01R-1%  [R0603]  93.85 34.69 270 top
RP87  0.01R-1%  [R0603]  94.62 41.43 270 top
RP89  0.01R-1%  [R0603]  97.23 39.7 0 top
RP91  0.01R-1%  [R0603]  31.52 30.74 0 bottom
RP100  1K  [R0402]  80.95 21.53 270 top
RP114  NC  [R0603]  61.19 51.19 0 bottom
RP121  NC/4K7  [R0402]  82 54.1 90 top
RP123  NC/4K7  [R0402]  81.1 54.11 90 top
RP124  NC  [R0603]  25.71 19.47 90 bottom
RP126  4K7  [R0402]  77.9 54.48 0 top
RP128  1K  [R0402]  80.72 51.51 270 top
RP138  0.01R-1%  [R0603]  31.51 32.04 0 bottom
RP139  0.01R-1%  [R0603]  97.68 44.65 0 bottom
RP162  NC  [R0603]  95.24 47.73 90 top
RP190  2K7  [R0603]  90.45 60.29 0 top
RP191  30K  [R0603]  80.87 51.3 90 bottom
RP217  0.01R-1%  [R0603]  97.69 43.33 0 bottom
RP219  0.01R-1%  [R0603]  101.54 45.83 0 top
RP235  0.01R-1%  [R0805]  54.03 59.25 180 bottom
RP245  0.01R-1%  [R0603]  91.48 54.35 90 bottom
RP287  0.01R-1%  [R0603]  98.97 54.92 0 top
RP291  0.01R-1%  [R0603]  97.89 47.73 90 top
RP305  0.01R-1%  [R0603]  97.46 61.02 0 bottom
RP306  0.01R-1%  [R0603]  98.97 56.25 0 top
RP307  0.01R-1%  [R0603]  48.75 57.3 90 bottom
RP308  0.01R-1%  [R0603]  96.11 9.22 270 bottom
RP312  0.01R-1%  [R0603]  97.47 46.41 0 bottom
RP313  0R  [R0805]  86.64 5.43 270 top
RP315  NC  [R0603]  95.18 34.67 270 top
RP316  NC  [R0603]  96.57 47.73 90 top
RP317  NC/0.01R-1%  [R0603]  24.6 22.03 180 bottom
RP318  0.01R-1%  [R0805]  69.02 43.46 180 bottom
RP319  0.01R-1%  [R0805]  77.89 27.41 0 top
RP320  0.01R-1%  [R0805]  85.92 28.57 0 top
RP321  NC/0.01R-1%  [R0603]  82.32 28.7 180 top
RP322  0.01R-1%  [R0603]  74.85 35.45 0 top
RP325  0.01R-1%  [R0805]  10.61 58.37 0 bottom
RP327  0.01R-1%  [R0603]  66.78 48.67 270 bottom
RP328  NC/0.01R-1%  [R0603]  22.55 33.44 0 bottom
RP329  0.01R-1%  [R0603]  100.74 19.9 90 top
RP330  0.01R-1%  [R0603]  22.53 34.74 0 bottom
RP333  NC  [R0603]  97.67 42.01 0 bottom
RP334  NC  [R0603]  97.64 40.7 0 bottom
RP335  0.01R-1%  [R0603]  49.49 54.31 270 bottom
RP336  0.01R-1%  [R0603]  98.97 53.59 0 top
RP337  0.01R-1%  [R0603]  49.32 18.26 90 bottom
RP338  0.01R-1%  [R0603]  46.92 55.34 180 bottom
RP339  0.01R-1%  [R0603]  63.27 53.23 180 bottom
RP340  NC  [R0603]  46.3 57.74 180 bottom
RP341  NC  [R0603]  93.1 57.98 180 bottom
RP343  NC  [R0603]  60.27 53.72 180 bottom
RP344  NC  [R0603]  55.12 56.67 270 bottom
RP365  0R  [R0402]  50.17 17.39 270 top
RP388  0R  [R0402]  45.76 27.84 270 bottom
RP391  0R  [R0402]  46.67 27.76 270 bottom
RP408  NC/4K7  [R0402]  79.28 51.79 180 top
RP409  NC/4K7  [R0402]  79.3 50.85 180 top
RP410  0.01R-1%  [R0603]  91.13 43.52 180 bottom
RP412  NC  [R0603]  96.31 49.96 270 bottom
RP413  0.01R-1%  [R0603]  101.53 47.48 0 top
RP422  0.01R-1%  [R0805]  84.56 57.17 180 top
RP423  0.01R-1%  [R0805]  73.31 47.91 180 top
RP424  0.01R-1%  [R0805]  74.08 44.94 90 top
RP425  0.01R-1%  [R0805]  77.91 32.61 180 top
RP426  0.01R-1%  [R0805]  74.31 41.22 270 top
RP427  0.01R-1%  [R0805]  82.17 33.76 0 top
RP428  0.01R-1%  [R0805]  88.73 57.77 90 top
RP429  0.01R-1%  [R0805]  85.88 33.85 180 top
RP430  0.01R-1%  [R0805]  89.76 33.88 0 top
RP433  0.01R-1%  [R0603]  96.23 55.44 270 bottom
RP434  0R  [R0402]  89.59 28.98 180 top
RP435  0R  [R0402]  92.86 49.45 0 top
RP438  0R  [R0402]  80.16 44.73 270 bottom
RP439  0R  [R0402]  83.38 26.99 270 top
RP440  0.01R-1%  [R0603]  92.29 36.57 0 bottom
RP444  NC/0.01R-1%  [R0603]  101.55 44.49 0 top
RP445  0.01R-1%  [R0603]  11.26 33.32 90 bottom
RP446  0.01R-1%  [R0603]  31.51 33.38 0 bottom
RP447  0.01R-1%  [R0603]  98.97 57.58 0 top
RP448  0.01R-1%  [R0603]  8.35 44.31 0 bottom
RP449  NC/0.01R-1%  [R0603]  9.17 34.76 0 bottom
RP450  NC/0.01R-1%  [R0603]  8.35 46.87 0 bottom
RP451  0.01R-1%  [R0603]  60.16 45.28 180 bottom
RP452  0.01R-1%  [R0603]  63.93 49.85 0 bottom
RP453  0.01R-1%  [R0603]  92.53 31.93 90 top
RP454  0.01R-1%  [R0603]  58.42 40.99 90 bottom
RP455  NC  [R0603]  92.54 34.68 270 top
RP456  0.01R-1%  [R0603]  56.91 48.2 180 bottom
RP457  0.01R-1%  [R0603]  31.26 62.52 0 bottom
RP458  NC  [R0603]  38.06 67.55 180 top
RP459  NC/0.01R-1%  [R0603]  58.53 2.15 180 top
RP460  NC  [R0603]  88.1 11.67 270 bottom
RP461  NC/0.01R-1%  [R0603]  25.9 10.21 180 top
RP462  NC/0.01R-1%  [R0603]  31.78 10.19 180 top
RU1  0R  [R0402]  12.05 13.72 180 top
RU2  0R  [R0402]  12.05 14.63 180 top
RU6  47K  [R0402]  12.26 19.43 270 top
RU7  1K  [R0402]  13.17 20.28 90 top
RW1  33R  [R0402]  42.1 60.93 90 top
RW83  33R  [R0402]  41.48 54.42 90 bottom
RW84  0R  [R0402]  37.19 10.38 270 top
RW85  0R  [R0402]  44.21 24.09 270 bottom
RW86  0R  [R0402]  39.38 9.14 270 top
RW87  0R  [R0402]  40.32 9.15 270 top
T7  SATO  [TP30]  36.38 47.65 90 bottom
T8  SDTO  [TP30]  32.92 47.53 270 top
T9  TEST  [TP30]  20.72 40.12 270 top
T10  TEST  [TP30]  24.95 56.07 270 top
T11  TEST  [TP30]  16.16 38.92 270 top
T12  TEST  [TP30]  24.36 55.64 270 top
T13  TEST  [TP30]  29.83 40.12 270 top
T14  TEST  [TP30]  26.37 37.36 270 top
T15  TEST  [TP30]  25.66 41.24 270 top
T16  TEST  [TP30]  15.54 52.31 90 bottom
T17  TEST  [TP30]  28.96 38.11 270 top
T18  TEST  [TP30]  29.9 41.24 270 top
T19  TEST  [TP30]  25.08 41.7 270 top
T20  TEST  [TP30]  18.27 38.04 270 top
T21  TEST  [TP30]  28.23 38.55 270 top
T22  TEST  [TP30]  32.7 44.13 270 top
T23  TEST  [TP30]  20.31 53.06 90 bottom
T24  TEST  [TP30]  17.84 38.8 270 top
T25  TEST  [TP30]  35.93 51.64 90 bottom
T26  TEST  [TP30]  37.4 51.65 90 bottom
T27  TEST  [TP30]  17.61 57.85 270 top
T28  TEST  [TP30]  23.05 59.27 270 top
T29  TEST  [TP30]  31.15 51.07 270 top
T30  TEST  [TP30]  30.03 55.36 270 top
T31  TEST  [TP30]  32.75 52.97 270 top
T32  TEST  [TP30]  17.44 57.21 270 top
T33  TEST  [TP30]  14.72 46.57 90 bottom
T34  TEST  [TP30]  18.44 51.81 90 bottom
T35  TEST  [TP30]  30.55 51.82 270 top
T36  TEST  [TP30]  20.35 47.1 90 bottom
T37  TEST  [TP30]  21.14 50.54 90 bottom
T38  TEST  [TP30]  32.21 49.34 270 top
T39  TEST  [TP30]  21.17 47.27 90 bottom
T40  TEST  [TP30]  21.99 51.16 90 bottom
T41  TEST  [TP30]  25.69 48.05 270 top
T42  TEST  [TP30]  25.38 48.93 270 top
T43  TEST  [TP30]  16.85 57.77 270 top
T44  TEST  [TP30]  25.05 47.87 270 top
T45  TEST  [TP30]  24.85 49.39 270 top
T46  TEST  [TP30]  31.4 50.28 270 top
T47  TEST  [TP30]  35.27 24.8 270 top
T48  TEST  [TP30]  34.25 33.49 270 top
T49  TEST  [TP30]  37.85 23.81 270 top
T50  TEST  [TP30]  31.37 32.14 270 top
T51  TEST  [TP30]  35.98 37.05 270 top
T52  TEST  [TP30]  33.61 33.57 270 top
T53  TEST  [TP30]  37.47 37.38 270 top
T54  TEST  [TP30]  32.9 34.33 270 top
T55  TEST  [TP30]  32.31 32.62 270 top
T56  TEST  [TP30]  36.07 24.04 270 top
T57  TEST  [TP30]  38.69 24.8 270 top
T58  TEST  [TP30]  30.97 29.79 270 top
T59  TEST  [TP30]  36.27 24.94 270 top
T60  TEST  [TP30]  35.64 26.58 270 top
T61  TEST  [TP30]  56.53 46.25 270 top
T62  TEST  [TP30]  56 45.63 270 top
T63  TEST  [TP30]  32.64 34.81 270 top
T64  TEST  [TP30]  48.47 47.65 90 bottom
T65  TEST  [TP30]  48.98 47.65 90 bottom
T66  TEST  [TP30]  47.46 47.65 90 bottom
T67  TEST  [TP30]  46.95 47.65 90 bottom
T68  TEST  [TP30]  46.92 48.65 90 bottom
T69  TEST  [TP30]  47.45 48.65 90 bottom
T70  TEST  [TP30]  48.97 48.65 90 bottom
T71  TEST  [TP30]  48.47 48.65 90 bottom
T72  TEST  [TP30]  55.46 46.38 270 top
T73  TEST  [TP30]  54.69 46.73 270 top
T74  TEST  [TP30]  60.8 45.68 270 top
T75  TEST  [TP30]  62.01 45.41 270 top
T76  TEST  [TP30]  75.88 17.45 270 top
T77  TEST  [TP30]  61.92 46.12 270 top
T78  TEST  [TP30]  61.4 47.26 270 top
T79  TEST  [TP30]  76.6 17.62 270 top
T81  TEST  [TP30]  31.43 54.8 270 top
T82  TEST  [TP30]  30.36 54.95 270 top
T83  TEST  [TP30]  25.91 56.2 270 top
T84  TEST  [TP30]  24.31 54.67 270 top
T85  TEST  [TP30]  24.68 42.1 270 top
T86  TEST  [TP30]  24.58 40.93 270 top
T103  TEST  [TP30]  30.99 34.96 270 top
T108  TEST  [TP30]  29.22 35.22 270 top
T110  TEST  [TP30]  29.34 36.36 270 top
T116  TEST  [TP30]  38.39 24.12 270 top
T117  TEST  [TP30]  35.37 36.78 270 top
T118  TEST  [TP30]  36.09 21.78 90 bottom
T119  TEST  [TP30]  36.38 21.3 90 bottom
T120  TEST  [TP30]  35.96 23.37 90 bottom
T121  TEST  [TP30]  37.01 19.27 90 bottom
T131  TEST  [TP30]  31.91 15.66 90 bottom
T132  TEST  [TP30]  34.42 16.47 90 bottom
T133  TEST  [TP30]  35.62 16.73 90 bottom
T134  TEST  [TP30]  36.68 18.25 90 bottom
T135  TEST  [TP30]  36.54 16.73 90 bottom
T136  TEST  [TP30]  37.95 16.37 90 bottom
T137  TEST  [TP30]  37.06 16.7 90 bottom
T138  TEST  [TP30]  37.06 17.87 90 bottom
T139  TEST  [TP30]  38 18.1 90 bottom
T140  TEST  [TP30]  25.15 25.38 180 bottom
T141  TEST  [TP30]  26.55 25.86 270 top
T142  TEST  [TP30]  27.44 29.45 180 bottom
T143  TEST  [TP30]  44.44 42.67 90 bottom
T144  TEST  [TP30]  43.34 42.3 90 bottom
T145  TEST  [TP30]  41.47 46.22 90 bottom
T146  TEST  [TP30]  40.43 51.11 90 bottom
T147  TEST  [TP30]  45.39 46.64 90 bottom
T148  TEST  [TP30]  30.58 24.1 270 top
T149  TEST  [TP30]  54.22 50.73 270 top
T150  TEST  [TP30]  73.06 25.6 270 top
T151  TEST  [TP30]  53.51 51.35 270 top
T152  TEST  [TP30]  72.97 24.76 270 top
T153  TEST  [TP30]  72 24.49 270 top
T154  TEST  [TP30]  73.58 23.79 270 top
T155  TEST  [TP30]  72.61 23.52 270 top
T156  TEST  [TP30]  72.93 22.31 270 top
T157  TEST  [TP30]  25.75 66.28 90 top
T158  TEST  [TP30]  29.69 66.3 90 top
T159  TEST  [TP30]  28.68 66.31 90 top
T160  TEST  [TP30]  26.79 66.32 90 top
T161  TEST  [TP30]  45.69 13.42 270 top
T162  TEST  [TP30]  50.31 15.4 270 top
T163  TEST  [TP30]  46.1 32.85 270 bottom
T164  TEST  [TP30]  53.16 15.36 270 top
T165  TEST  [TP30]  38.28 6.78 270 top
T166  TEST  [TP30]  39.18 7.03 270 top
T167  TEST  [TP30]  37.98 11.18 90 top
T168  TEST  [TP30]  41.86 10.54 90 top
T169  TEST  [TP30]  44.43 25.57 90 top
T170  TEST  [TP30]  40.7 10.58 0 top
TP7  USB1-ID-TEST  [TP100]  55.84 32.99 270 top
U1  A736-V0.1.1  [BGA667P50B1700_1700H112]  42.42 46.65 270 top
U58  NC/TXB0304RUTR  [QFN12P40B170_200H55]  17.02 17.59 0 top
UD1  LPDDR4_FBGA200  [BGA200P65_80B1000_1500H90]  18.74 48.51 180 top
UL1  RT9293B  [SOT6P95B160_290H145]  108.25 4.3 90 top
UM1  EMMC  [BGA169P50B1200_1600H100]  15.74 28.04 90 top
UM3  NC/NAND  [SOP48P50B1200_1840H120]  15.63 28.11 180 top
UM5  NC/value  [SOP8P127B390_490H155]  22.43 16.52 0 top
UM6  UFS  [BGA153P50B1150_1300H90]  36.26 17.51 270 top
UM8  SY8089A1AAC  [SOT5P95B160_300H130]  28.42 7.41 0 top
UM9  SY8089A1AAC  [SOT5P95B160_300H130]  18.14 6.58 0 top
UP7  AXP8191Q  [QFN77P40B900_900H85_A]  85.96 45.62 180 top
Y1  24M/19.2M/26M-20pF-10ppm  [X4B250_320H120_SMD]  39.44 27.24 0 top
Y2  32.768K-12.5pF-20ppm  [X2B150_320H75_SMD]  39.03 30.34 0 top

## Library data of the parts
C1 C3-C85 C130-C132 C134 C135 C231-C234 C236-C238 C240-C251 C256-C259 C268-C276 CD1-CD58 CM1-CM7 CM9-CM11 CM15-CM18 CM21 CM23 CM50-CM53 CM59-CM62 CP56 CP58 CP61 CP62 CP65 CP68 CP69 CP72 CP74 CP78-CP81 CP84 CP87 CP88 CP90 CP92 CP93 CP96 CP98 CP100 CS8 CS9 = C-C0402
C235 C239 CL68 = C-C0603
CL2 CL10-CL12 = C-C0805
CL9 CL13 CL67 CL69 = C-C0402: room: EMMC
CM24-CM35 CM37 CM39 CM54-CM58 = C-C0402-X5R_0
CP49-CP55 CP57 CP59 CP60 CP63 CP64 CP66 CP67 CP70 CP71 CP73 CP75-CP77 CP82 CP83 CP85 CP86 CP89 CP91 CP94 CP95 CP97 CP99 CP101-CP113 = CAP NP
CPU-PLL-TEST PLL-TEST T7-T79 T81-T86 T103 T108 T110 T116-T121 T131-T170 = TestPoint-on wire
D4 D6 D8 D9 D51 = ESD5451X_0
D37 D58 D60 = DIO-1N5400_1
D57 = LED_2
D59 = DIO-IN5819: Tolerance: RichardLC
DC1-DC8 ESD37 ESD40 = ESD9B5VL
DL1 = DIODE_SCHOTTKY_0
DL3 = DIO-SS16F
ESD38 ESD39 ESD41 = ESD5451X
H6 H20-H22 = HOLE
J24 = XH2.54MM-5P-M
J44 = Type-C_0
J47 J48 = LB242-180P-B3R-01_1
JC1 = TF-SLOT
JL2 = LVDS_CN_2
JL3 = CTP_CN_2
K7-K9 = KEY-02P-SMD-01
L9 = ICMS212B900MFR_1
LL1 = INDUCTOR_3
LM1 LM2 = L-L2520
LP1-LP9 = INDUCTOR
Q6 Q7 = NMOS-BSN20
QL1 = FDS4953_1
QL2 = NPN-MMBT3904_0
QP5 = BSN20
R1 R6 R15 R17 R19 R70 R71 R123 R125 R418-R421 R424 R425 R566 R607 R959 R1101 RC2 RC3 RC5 RC16 RD1 RD2 RL3 RL6 RL7 RL11 RL220 RL221 RL228 RM9-RM20 RM22-RM31 RM36 RM46 RM52-RM54 RM56-RM59 RP100 RW83-RW87 = R-R0402-5%
R2 R5 R7 R9 R1102 RP33 RP35 RP36 RP38 RP41 RP47 RP48 RP54 RP61 RP62 RP65-RP67 RP69 RP75 RP85 RP87 RP89 RP91 RP114 RP124 RP138 RP139 RP162 RP217 RP219 RP235 RP245 RP287 RP291 RP305-RP308 RP312 RP313 RP315-RP322 RP325 RP327-RP330 RP333-RP341 RP343 RP344 RP410 RP412 RP413 RP422-RP430 RP433 RP440 RP444-RP462 = R-R0603-1%
R11-R13 R18 R20-R24 R72 R376-R380 R430 R548 R549 R560-R563 R608 R609 R964-R967 R1109 RD3-RD5 RM3 RM37 RM38 RM41 RM47 RM55 = R-R0402-1%
R103 R105 R140-R145 R552 R553 R960-R963 R1103-R1106 RP434 RP435 RP438 RP439 = R-R0805-5%
R1100 RA99 = R: room: AC100
R1107 R1108 = R-R0603-1%: signal model: R-R0603-1%_R0603_NC_NC
RC1 = R-R0402-5%: signal model: Graser_RC1
RC10 = R-R0402-5%: signal model: Graser_RC10
RC11 = R-R0402-5%: signal model: Graser_RC11
RC12 = R-R0402-5%: signal model: Graser_RC12
RC13 = R-R0402-5%: signal model: Graser_RC13
RC14 = R-R0402-5%: signal model: Graser_RC14
RC15 = R-R0402-5%: signal model: Graser_RC15
RL4 RL5 RL14 RL15 RL17 RL224 RL225 RL227 RL240 = R-R0402: room: EMMC
RL8-RL10 = RESISTOR
RL12 RP121 RP123 RP126 RP190 RP191 RP408 RP409 = R
RL13 RL18 RL212 RL226 RL229 RL241 RL242 = R-R0603
RL230-RL239 = R-R0402: signal model: R-R0402_R0402_0R_0R; room: EMMC
RM1 = R-R0402-1%: signal model: R-R0402-1%_R0402_33R_33R
RP128 = R-R0805-1%
RP365 RP388 RP391 = R-R0603-1%_2
RU1 RU2 = R-R0402-5%_0: signal model: R-R0402-5%_0_R0402_0R_0R
RU6 RU7 = R-R0402-5%: room: EMMC
RW1 = R-R0402-5%: signal model: R-R0402-5%_R0402_33R_33R
TP7 = TestPoint-SMD
U1 = A736-V1.0
U58 = TXB0304RUTR
UD1 = LPDDR4_FBGA200
UL1 = RT9293B
UM1 = EMMC5.0-BGA169
UM3 = NAND-FLASH-TSOP48
UM5 = SPI-NOR-SOP8
UM6 = UFS_0
UM8 UM9 = SY8089A
UP7 = AXP8191_1
Y1 = CRY-24MHz-3225-SMD
Y2 = CRY-32_0.768KHz-2X6-DIP

## Footprints (pads in the part's own frame, mm; a bottom-side part is the same pattern mirrored in y, then rotated)
BGA153P50B1150_1300H90
  oval 0.195x0.321 smd: A1(-3.25,3.25) A2(-2.75,3.25) A3(-2.25,3.25) A4(-1.75,3.25) A5(-1.25,3.25) A6(-0.75,3.25) A7(-0.25,3.25) A8(0.25,3.25) A9(0.75,3.25) A10(1.25,3.25) A11(1.75,3.25) A12(2.25,3.25) A13(2.75,3.25) P2(-2.75,-3.25) P3(-2.25,-3.25) P4(-1.75,-3.25) P5(-1.25,-3.25) P6(-0.75,-3.25) P7(-0.25,-3.25) P8(0.25,-3.25) P9(0.75,-3.25) P10(1.25,-3.25) P11(1.75,-3.25) P12(2.25,-3.25) P13(2.75,-3.25) P14(3.25,-3.25)
  oval 0.321x0.195 smd: A14(3.25,3.25) B1(-3.25,2.75) B14(3.25,2.75) C1(-3.25,2.25) C14(3.25,2.25) D1(-3.25,1.75) D14(3.25,1.75) E1(-3.25,1.25) E14(3.25,1.25) F1(-3.25,0.75) F14(3.25,0.75) G1(-3.25,0.25) G14(3.25,0.25) H1(-3.25,-0.25) H14(3.25,-0.25) J1(-3.25,-0.75) J14(3.25,-0.75) K1(-3.25,-1.25) K14(3.25,-1.25) L1(-3.25,-1.75) L14(3.25,-1.75) M1(-3.25,-2.25) M14(3.25,-2.25) N1(-3.25,-2.75) N14(3.25,-2.75) P1(-3.25,-3.25)
  round 0.25 smd: B2(-2.75,2.75) B3(-2.25,2.75) B4(-1.75,2.75) B5(-1.25,2.75) B6(-0.75,2.75) B7(-0.25,2.75) B8(0.25,2.75) B9(0.75,2.75) B10(1.25,2.75) B11(1.75,2.75) B12(2.25,2.75) B13(2.75,2.75) C2(-2.75,2.25) C3(-2.25,2.25) C4(-1.75,2.25) C5(-1.25,2.25) C6(-0.75,2.25) C7(-0.25,2.25) C8(0.25,2.25) C9(0.75,2.25) C10(1.25,2.25) C11(1.75,2.25) C12(2.25,2.25) C13(2.75,2.25) D2(-2.75,1.75) D3(-2.25,1.75) D4(-1.75,1.75) D12(2.25,1.75) D13(2.75,1.75) E2(-2.75,1.25) E3(-2.25,1.25) E5(-1.25,1.25) E6(-0.75,1.25) E7(-0.25,1.25) E8(0.25,1.25) E9(0.75,1.25) E10(1.25,1.25) E12(2.25,1.25) E13(2.75,1.25) F2(-2.75,0.75) F3(-2.25,0.75) F5(-1.25,0.75) F10(1.25,0.75) F12(2.25,0.75) F13(2.75,0.75) G2(-2.75,0.25) G3(-2.25,0.25) G5(-1.25,0.25) G10(1.25,0.25) G12(2.25,0.25) G13(2.75,0.25) H2(-2.75,-0.25) H3(-2.25,-0.25) H5(-1.25,-0.25) H10(1.25,-0.25) H12(2.25,-0.25) H13(2.75,-0.25) J2(-2.75,-0.75) J3(-2.25,-0.75) J5(-1.25,-0.75) J10(1.25,-0.75) J12(2.25,-0.75) J13(2.75,-0.75) K2(-2.75,-1.25) K3(-2.25,-1.25) K5(-1.25,-1.25) K6(-0.75,-1.25) K7(-0.25,-1.25) K8(0.25,-1.25) K9(0.75,-1.25) K10(1.25,-1.25) K12(2.25,-1.25) K13(2.75,-1.25) L2(-2.75,-1.75) L3(-2.25,-1.75) L12(2.25,-1.75) L13(2.75,-1.75) M2(-2.75,-2.25) M3(-2.25,-2.25) M4(-1.75,-2.25) M5(-1.25,-2.25) M6(-0.75,-2.25) M7(-0.25,-2.25) M8(0.25,-2.25) M9(0.75,-2.25) M10(1.25,-2.25) M11(1.75,-2.25) M12(2.25,-2.25) M13(2.75,-2.25) N2(-2.75,-2.75) N3(-2.25,-2.75) N4(-1.75,-2.75) N5(-1.25,-2.75) N6(-0.75,-2.75) N7(-0.25,-2.75) N8(0.25,-2.75) N9(0.75,-2.75) N10(1.25,-2.75) N11(1.75,-2.75) N12(2.25,-2.75) N13(2.75,-2.75)
BGA169P50B1200_1600H100
  round 0.25 smd: A4(-1.75,6.75) A6(-0.75,6.75) A9(0.75,6.75) A11(1.75,6.75) AE1(-3.25,-5.25) AE14(3.25,-5.25) AG2(-2.75,-6.25) AG13(2.75,-6.25) AH4(-1.75,-6.75) AH6(-0.75,-6.75) AH9(0.75,-6.75) AH11(1.75,-6.75) B2(-2.75,6.25) B13(2.75,6.25) D1(-3.25,5.25) D14(3.25,5.25) J2(-2.75,2.75) J3(-2.25,2.75) J4(-1.75,2.75) J5(-1.25,2.75) J6(-0.75,2.75) J7(-0.25,2.75) J8(0.25,2.75) J9(0.75,2.75) J10(1.25,2.75) J11(1.75,2.75) J12(2.25,2.75) J13(2.75,2.75) K2(-2.75,2.25) K3(-2.25,2.25) K4(-1.75,2.25) K5(-1.25,2.25) K6(-0.75,2.25) K7(-0.25,2.25) K8(0.25,2.25) K9(0.75,2.25) K10(1.25,2.25) K11(1.75,2.25) K12(2.25,2.25) K13(2.75,2.25) L2(-2.75,1.75) L3(-2.25,1.75) L4(-1.75,1.75) L12(2.25,1.75) L13(2.75,1.75) M2(-2.75,1.25) M3(-2.25,1.25) M5(-1.25,1.25) M6(-0.75,1.25) M7(-0.25,1.25) M8(0.25,1.25) M9(0.75,1.25) M10(1.25,1.25) M12(2.25,1.25) M13(2.75,1.25) N2(-2.75,0.75) N3(-2.25,0.75) N5(-1.25,0.75) N10(1.25,0.75) N12(2.25,0.75) N13(2.75,0.75) P2(-2.75,0.25) P3(-2.25,0.25) P5(-1.25,0.25) P10(1.25,0.25) P12(2.25,0.25) P13(2.75,0.25) R2(-2.75,-0.25) R3(-2.25,-0.25) R5(-1.25,-0.25) R10(1.25,-0.25) R12(2.25,-0.25) R13(2.75,-0.25) T2(-2.75,-0.75) T3(-2.25,-0.75) T5(-1.25,-0.75) T10(1.25,-0.75) T12(2.25,-0.75) T13(2.75,-0.75) U2(-2.75,-1.25) U3(-2.25,-1.25) U5(-1.25,-1.25) U6(-0.75,-1.25) U7(-0.25,-1.25) U8(0.25,-1.25) U9(0.75,-1.25) U10(1.25,-1.25) U12(2.25,-1.25) U13(2.75,-1.25) V2(-2.75,-1.75) V3(-2.25,-1.75) V12(2.25,-1.75) V13(2.75,-1.75) W2(-2.75,-2.25) W3(-2.25,-2.25) W4(-1.75,-2.25) W5(-1.25,-2.25) W6(-0.75,-2.25) W7(-0.25,-2.25) W8(0.25,-2.25) W9(0.75,-2.25) W10(1.25,-2.25) W11(1.75,-2.25) W12(2.25,-2.25) W13(2.75,-2.25) Y2(-2.75,-2.75) Y3(-2.25,-2.75) Y4(-1.75,-2.75) Y5(-1.25,-2.75) Y6(-0.75,-2.75) Y7(-0.25,-2.75) Y8(0.25,-2.75) Y9(0.75,-2.75) Y10(1.25,-2.75) Y11(1.75,-2.75) Y12(2.25,-2.75) Y13(2.75,-2.75)
  oval 0.321x0.195 smd: AA1(-3.285,-3.25) H14(3.285,3.25) J1(-3.285,2.75) J14(3.285,2.75) K1(-3.285,2.25) K14(3.285,2.25) L1(-3.285,1.75) L14(3.285,1.75) M1(-3.285,1.25) M14(3.285,1.25) N1(-3.285,0.75) N14(3.285,0.75) P1(-3.285,0.25) P14(3.285,0.25) R1(-3.285,-0.25) R14(3.285,-0.25) T1(-3.285,-0.75) T14(3.285,-0.75) U1(-3.285,-1.25) U14(3.285,-1.25) V1(-3.285,-1.75) V14(3.285,-1.75) W1(-3.285,-2.25) W14(3.285,-2.25) Y1(-3.285,-2.75) Y14(3.285,-2.75)
  oval 0.195x0.321 smd: AA2(-2.75,-3.285) AA3(-2.25,-3.285) AA4(-1.75,-3.285) AA5(-1.25,-3.285) AA6(-0.75,-3.285) AA7(-0.25,-3.285) AA8(0.25,-3.285) AA9(0.75,-3.285) AA10(1.25,-3.285) AA11(1.75,-3.285) AA12(2.25,-3.285) AA13(2.75,-3.285) AA14(3.25,-3.285) H1(-3.25,3.285) H2(-2.75,3.285) H3(-2.25,3.285) H4(-1.75,3.285) H5(-1.25,3.285) H6(-0.75,3.285) H7(-0.25,3.285) H8(0.25,3.285) H9(0.75,3.285) H10(1.25,3.285) H11(1.75,3.285) H12(2.25,3.285) H13(2.75,3.285)
BGA200P65_80B1000_1500H90
  round 0.27 smd: A1(-4.4,6.825) A2(-3.6,6.825) A3(-2.8,6.825) A4(-2,6.825) A5(-1.2,6.825) A8(1.2,6.825) A9(2,6.825) A10(2.8,6.825) A11(3.6,6.825) A12(4.4,6.825) AA1(-4.4,-6.175) AA2(-3.6,-6.175) AA3(-2.8,-6.175) AA4(-2,-6.175) AA5(-1.2,-6.175) AA8(1.2,-6.175) AA9(2,-6.175) AA10(2.8,-6.175) AA11(3.6,-6.175) AA12(4.4,-6.175) AB1(-4.4,-6.825) AB2(-3.6,-6.825) AB3(-2.8,-6.825) AB4(-2,-6.825) AB5(-1.2,-6.825) AB8(1.2,-6.825) AB9(2,-6.825) AB10(2.8,-6.825) AB11(3.6,-6.825) AB12(4.4,-6.825) B1(-4.4,6.175) B2(-3.6,6.175) B3(-2.8,6.175) B4(-2,6.175) B5(-1.2,6.175) B8(1.2,6.175) B9(2,6.175) B10(2.8,6.175) B11(3.6,6.175) B12(4.4,6.175) C1(-4.4,5.525) C2(-3.6,5.525) C3(-2.8,5.525) C4(-2,5.525) C5(-1.2,5.525) C8(1.2,5.525) C9(2,5.525) C10(2.8,5.525) C11(3.6,5.525) C12(4.4,5.525) D1(-4.4,4.875) D2(-3.6,4.875) D3(-2.8,4.875) D4(-2,4.875) D5(-1.2,4.875) D8(1.2,4.875) D9(2,4.875) D10(2.8,4.875) D11(3.6,4.875) D12(4.4,4.875) E1(-4.4,4.225) E2(-3.6,4.225) E3(-2.8,4.225) E4(-2,4.225) E5(-1.2,4.225) E8(1.2,4.225) E9(2,4.225) E10(2.8,4.225) E11(3.6,4.225) E12(4.4,4.225) F1(-4.4,3.575) F2(-3.6,3.575) F3(-2.8,3.575) F4(-2,3.575) F5(-1.2,3.575) F8(1.2,3.575) F9(2,3.575) F10(2.8,3.575) F11(3.6,3.575) F12(4.4,3.575) G1(-4.4,2.925) G2(-3.6,2.925) G3(-2.8,2.925) G4(-2,2.925) G5(-1.2,2.925) G8(1.2,2.925) G9(2,2.925) G10(2.8,2.925) G11(3.6,2.925) G12(4.4,2.925) H1(-4.4,2.275) H2(-3.6,2.275) H3(-2.8,2.275) H4(-2,2.275) H5(-1.2,2.275) H8(1.2,2.275) H9(2,2.275) H10(2.8,2.275) H11(3.6,2.275) H12(4.4,2.275) J1(-4.4,1.625) J2(-3.6,1.625) J3(-2.8,1.625) J4(-2,1.625) J5(-1.2,1.625) J8(1.2,1.625) J9(2,1.625) J10(2.8,1.625) J11(3.6,1.625) J12(4.4,1.625) K1(-4.4,0.975) K2(-3.6,0.975) K3(-2.8,0.975) K4(-2,0.975) K5(-1.2,0.975) K8(1.2,0.975) K9(2,0.975) K10(2.8,0.975) K11(3.6,0.975) K12(4.4,0.975) N1(-4.4,-0.975) N2(-3.6,-0.975) N3(-2.8,-0.975) N4(-2,-0.975) N5(-1.2,-0.975) N8(1.2,-0.975) N9(2,-0.975) N10(2.8,-0.975) N11(3.6,-0.975) N12(4.4,-0.975) P1(-4.4,-1.625) P2(-3.6,-1.625) P3(-2.8,-1.625) P4(-2,-1.625) P5(-1.2,-1.625) P8(1.2,-1.625) P9(2,-1.625) P10(2.8,-1.625) P11(3.6,-1.625) P12(4.4,-1.625) R1(-4.4,-2.275) R2(-3.6,-2.275) R3(-2.8,-2.275) R4(-2,-2.275) R5(-1.2,-2.275) R8(1.2,-2.275) R9(2,-2.275) R10(2.8,-2.275) R11(3.6,-2.275) R12(4.4,-2.275) T1(-4.4,-2.925) T2(-3.6,-2.925) T3(-2.8,-2.925) T4(-2,-2.925) T5(-1.2,-2.925) T8(1.2,-2.925) T9(2,-2.925) T10(2.8,-2.925) T11(3.6,-2.925) T12(4.4,-2.925) U1(-4.4,-3.575) U2(-3.6,-3.575) U3(-2.8,-3.575) U4(-2,-3.575) U5(-1.2,-3.575) U8(1.2,-3.575) U9(2,-3.575) U10(2.8,-3.575) U11(3.6,-3.575) U12(4.4,-3.575) V1(-4.4,-4.225) V2(-3.6,-4.225) V3(-2.8,-4.225) V4(-2,-4.225) V5(-1.2,-4.225) V8(1.2,-4.225) V9(2,-4.225) V10(2.8,-4.225) V11(3.6,-4.225) V12(4.4,-4.225) W1(-4.4,-4.875) W2(-3.6,-4.875) W3(-2.8,-4.875) W4(-2,-4.875) W5(-1.2,-4.875) W8(1.2,-4.875) W9(2,-4.875) W10(2.8,-4.875) W11(3.6,-4.875) W12(4.4,-4.875) Y1(-4.4,-5.525) Y2(-3.6,-5.525) Y3(-2.8,-5.525) Y4(-2,-5.525) Y5(-1.2,-5.525) Y8(1.2,-5.525) Y9(2,-5.525) Y10(2.8,-5.525) Y11(3.6,-5.525) Y12(4.4,-5.525)
